# Altium PCB PCB_BOB.PcbDoc (part 1 of 2)
Units mil, origin at the board's own origin, x right, y up, seen from the top; angles counter-clockwise.
Board outline 2103 x 1454 mil, 2 copper layers (Top Layer, Bottom Layer), stack 62 mil thick; 57 components, 42 nets, 189 pads, 71 vias.
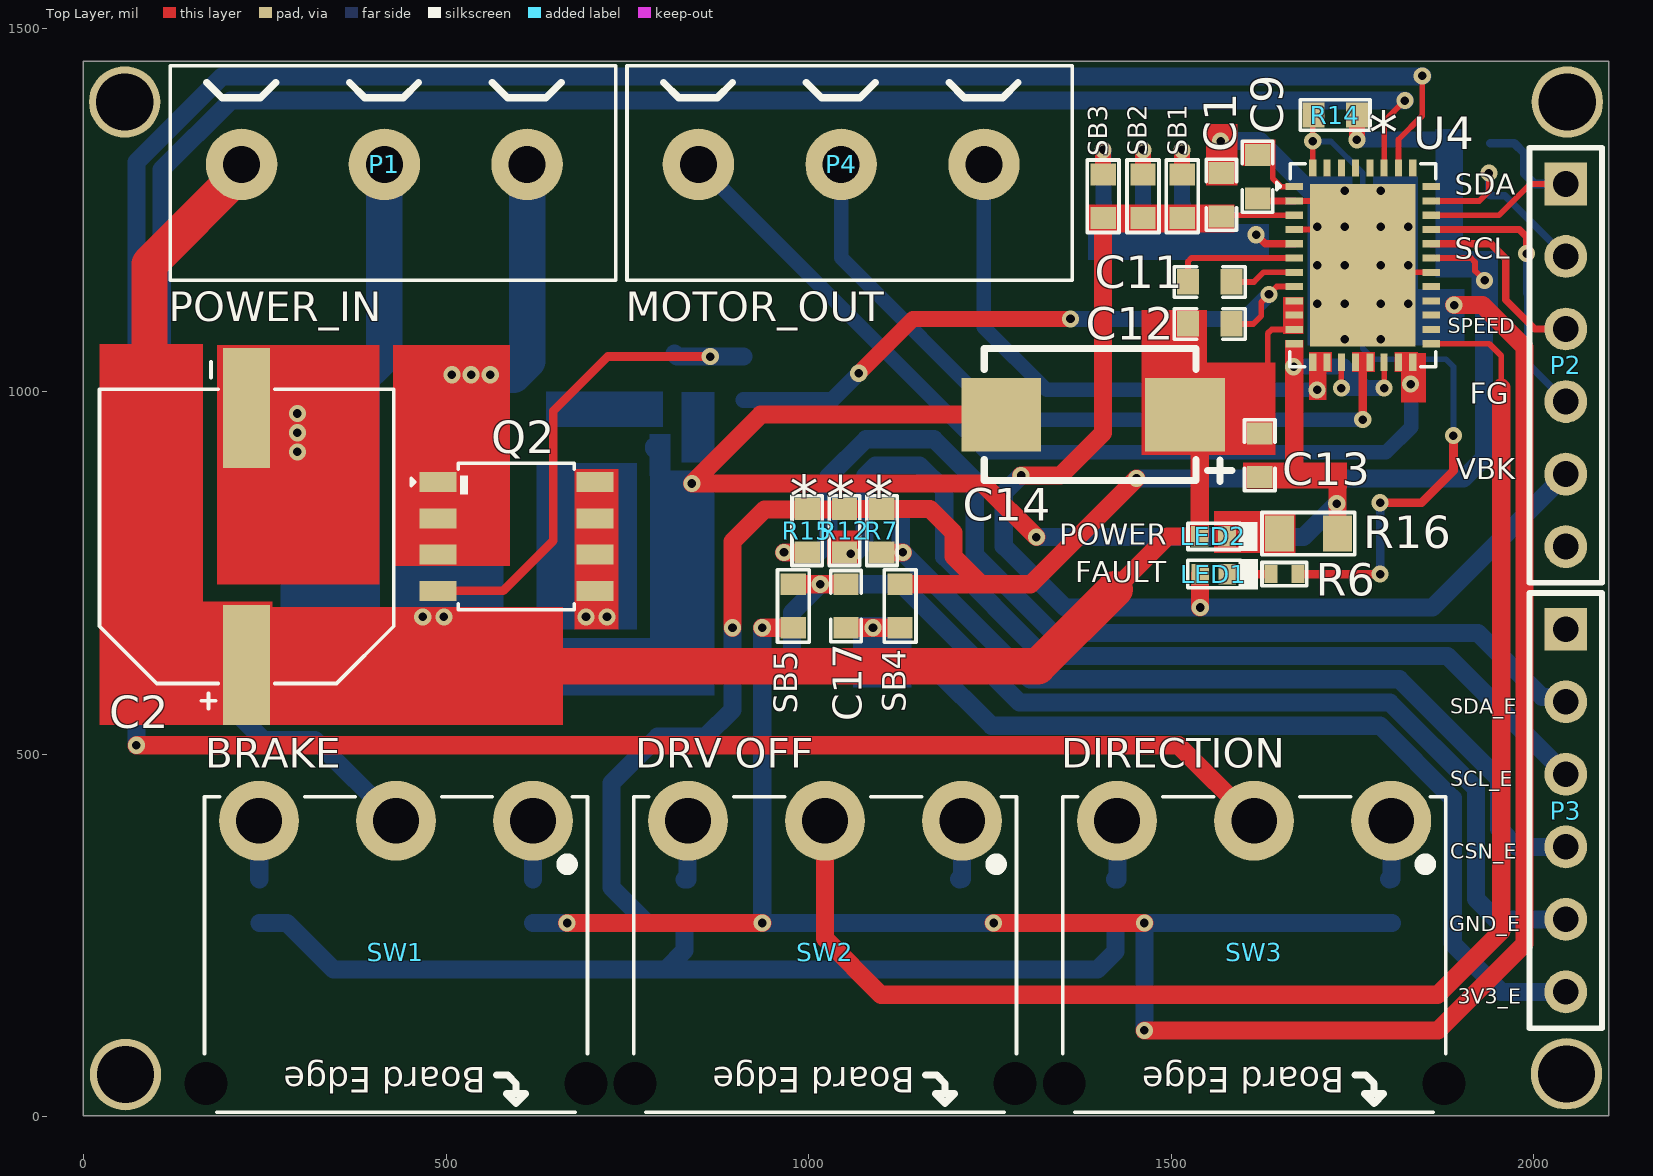
[diagram p0: Top Layer view]
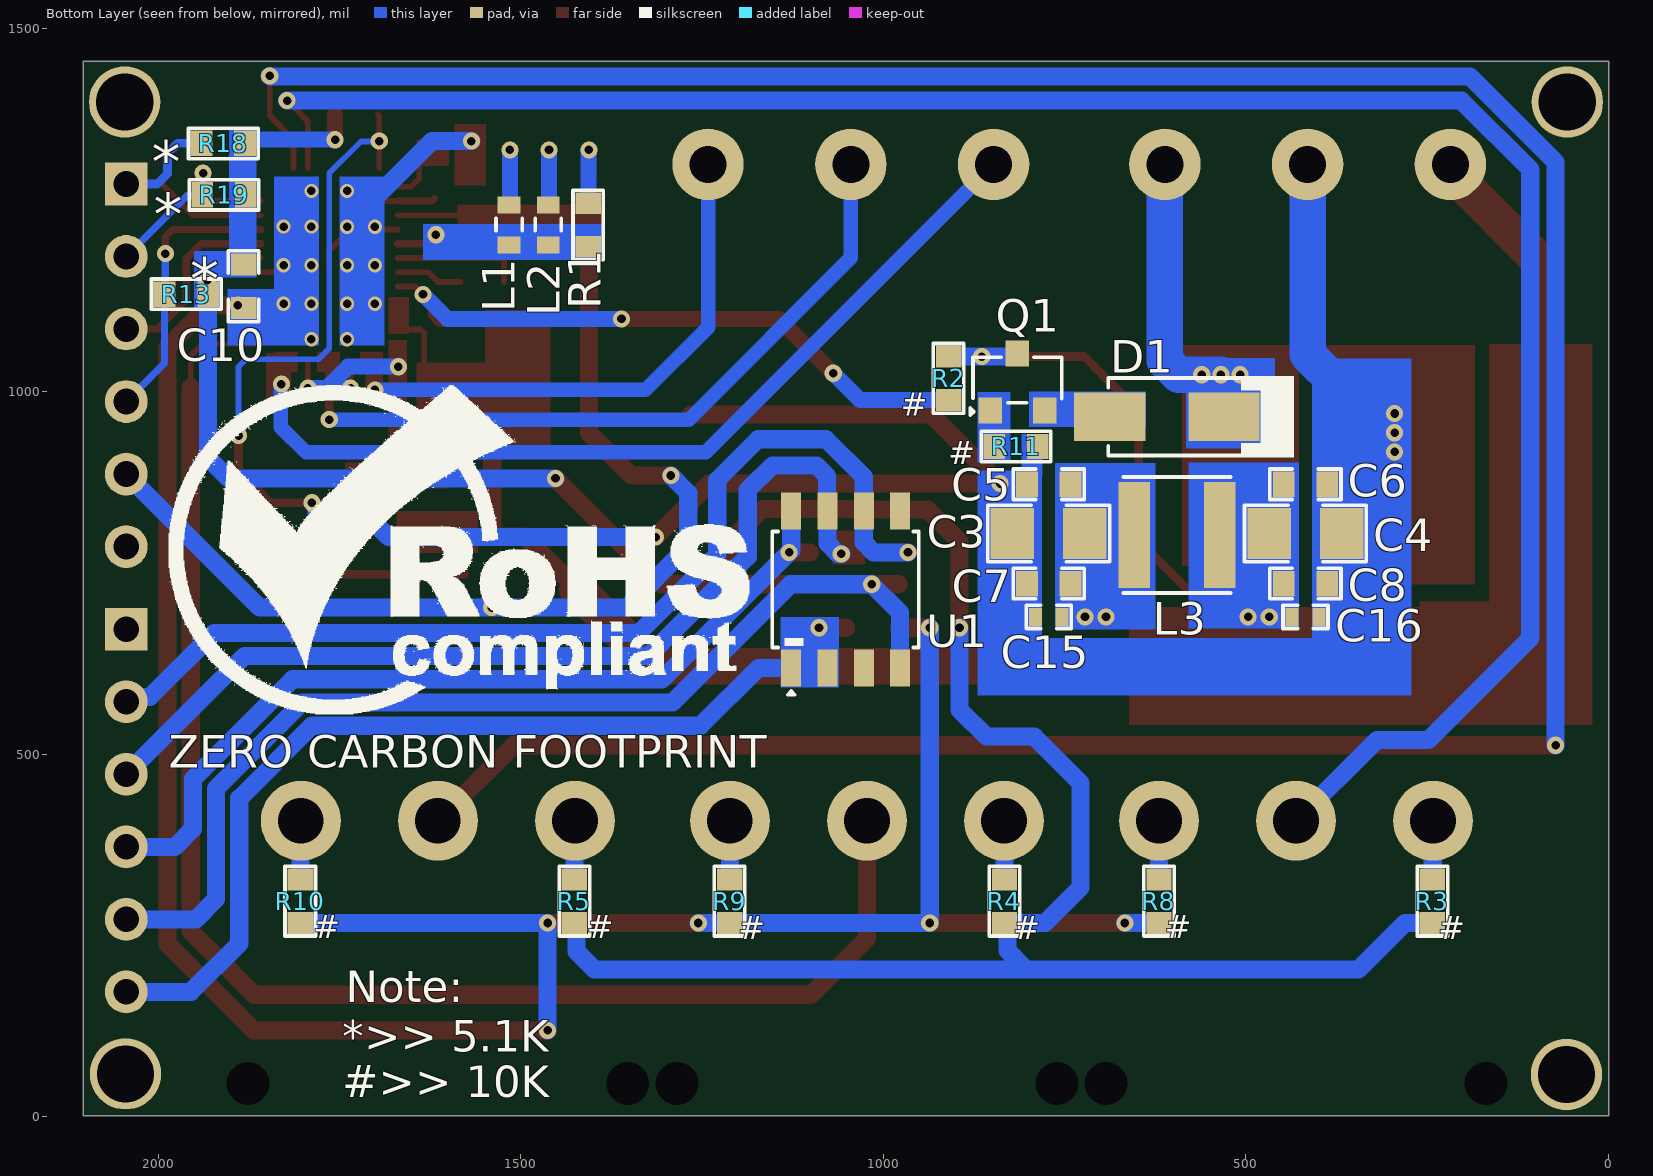
[diagram p1: Bottom Layer view, seen from below]
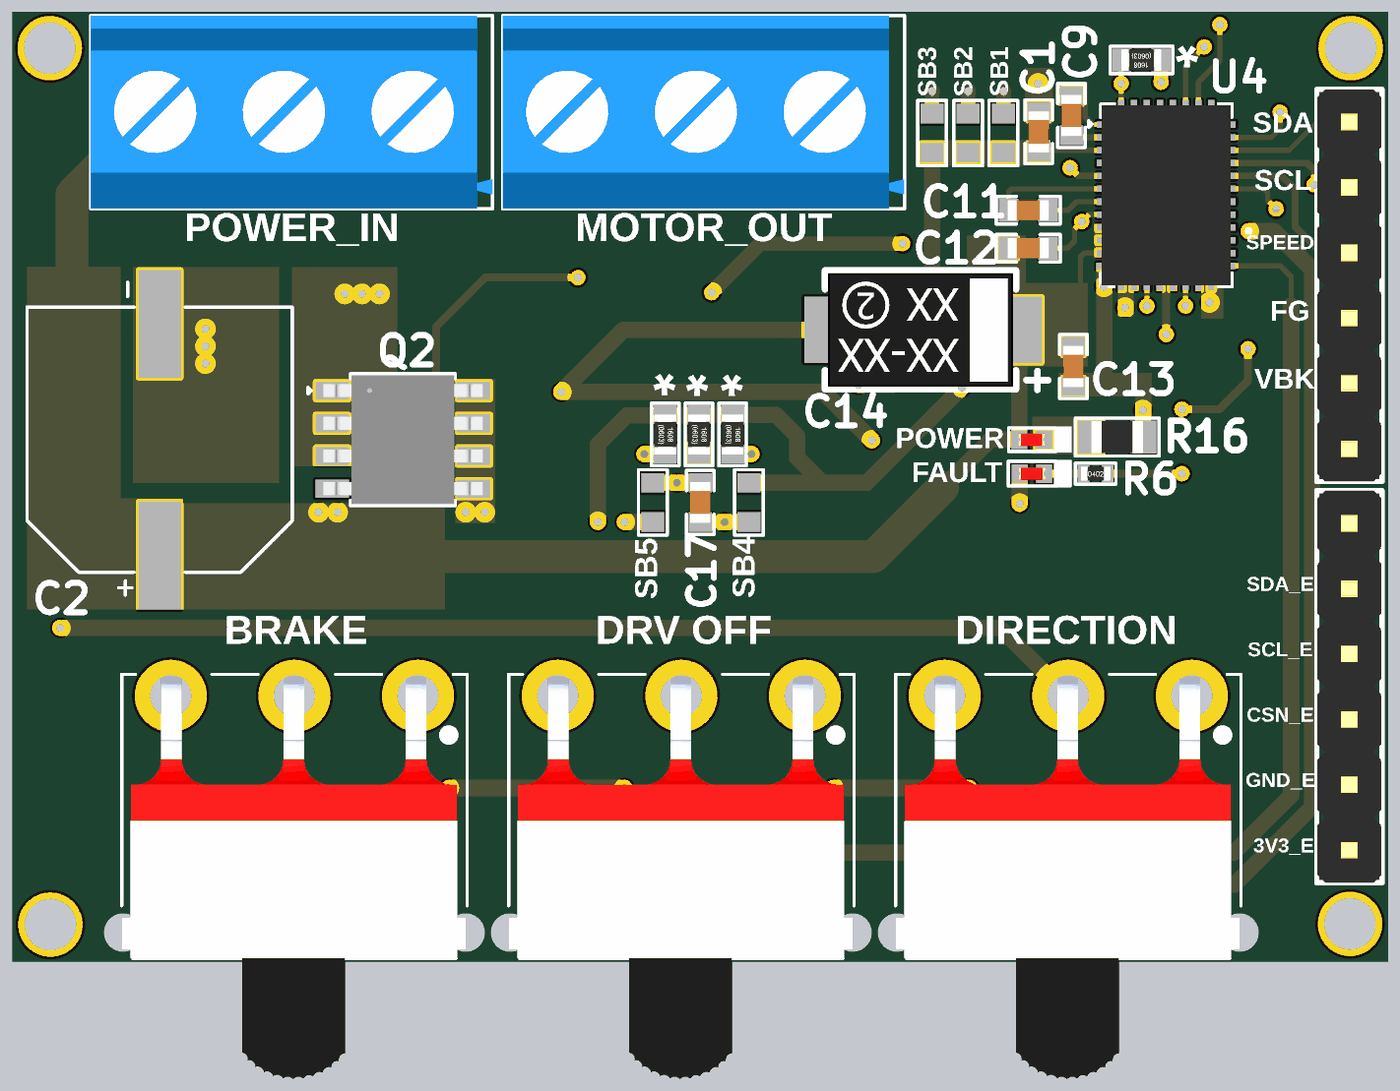
[diagram p2: 3D render of the assembled board from above, using the file's embedded part models]
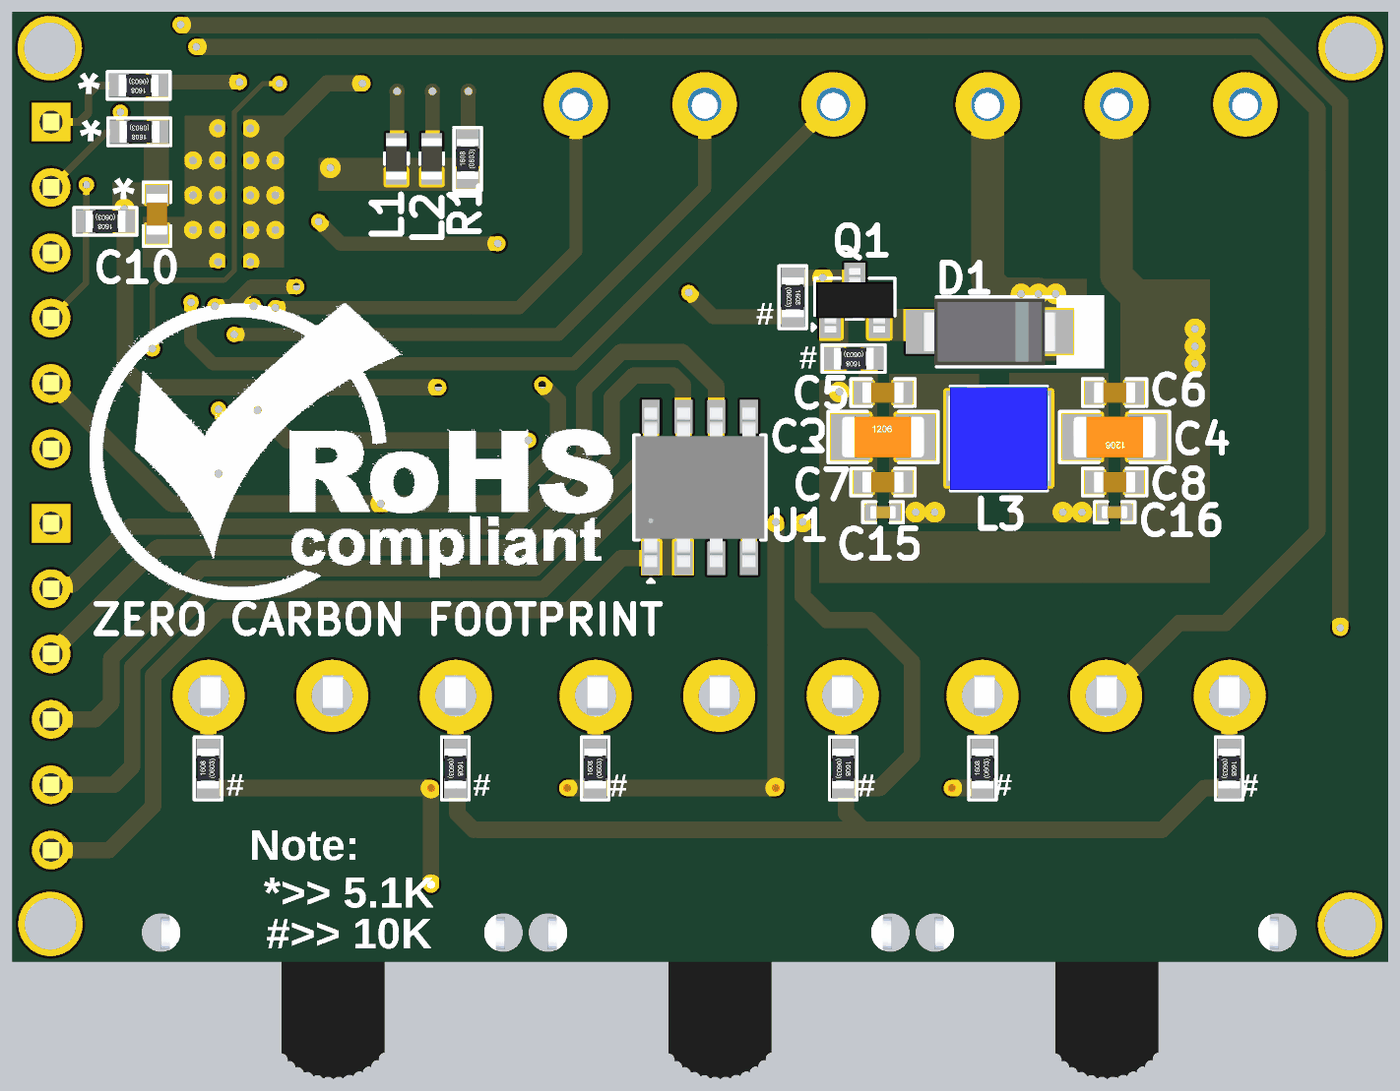
[diagram p3: 3D render of the assembled board from below, using the file's embedded part models]

## Layer stack, top to bottom
Top Solder: solder mask 0.5, Solder Resist, Dk 3.5
Top Layer: signal copper 12.5
Dielectric 1: dielectric 37, FR-4, Dk 4.8
Bottom Layer: signal copper 12.5
Bottom Solder: solder mask 0.5, Solder Resist, Dk 3.5

## Board outline
0,1 0,1455 2103,1455 2103,1

## Design rules (kind name [scope] priority, off if disabled: settings)
Clearance [All] p1: gap=7 ignorepadtopadclearanceinfootprint=FALSE except(4: Arc-SMDPad Track-SMDPad SMDPad-SMDPad)
ComponentClearance [All] p1: gap=0 collisioncheckmode=3 verticalgap=0 showdistances=FALSE
HoleSize [All] p1: absolutevalues=TRUE maxlimit=1000 minlimit=1 maxpercent=80.000 minpercent=20.000
HoleToHoleClearance [All] p1: gap=0 allowstackedmicrovias=TRUE
MinimumSolderMaskSliver [All] p1: minsoldermaskwidth=0
PolygonConnect [All] p1: connectstyle=Relief reliefconductorwidth=10 reliefentries=4 polygonreliefangle="90 Angle" airgapwidth=10
RoutingVias [All] p1: holewidth=11.81 width=23.62 viastyle="Through Hole" minholewidth=11.81 minwidth=19.68 maxholewidth=31.5 maxwidth=62.99
SilkToSilkClearance [All] p1: silktosilkclearance=0
SilkToSolderMaskClearance [IsPad] p1: minsilkscreentomaskgap=0 clearancetoexposedcopper=TRUE
SolderMaskExpansion [All] p1: expansion=4 istentingtop=FALSE
Width [All] p1: maxlimit=100 minlimit=8 preferedwidth=12 minimp=50.000000 maximp=50.000000 favimp=50.000000
24 further rules are at their usual default settings.

## Classes and differential pairs
component class U_Header_Connector: P1 P2 P3 P4
component class "U_Power Supply": C2 C3 C4 C5 C6 C7 C8 C15 C16 D1 L3 Q1 Q2 R2 R11
component class U_Encoder: C17 R7 R12 R15 SB4 SB5 U1
component class U_DRIVER: C1 C9 C10 C11 C12 C13 C14 L1 L2 R1 R13 R14 R18 R19 SB1 SB2 SB3 U4
component class U_Control_Indicator: LED1 LED2 R3 R4 R5 R6 R8 R9 R10 R16 SW1 SW2 SW3

## Components (designator, comment, footprint, x,y, rotation, side; value= is the part's Value field where it differs from the comment)
C1 "22uF" Cap-0603 1569,1271 r270 top
C2 "330uF" VZT-330uF-10mmDia 225,800 r90 top locked
C3 "1uF" Cap-1206 772,804 r180 bottom locked
C4 "1uF" Cap-1206 418,804 r0 bottom locked
C5 "0.1uF" Cap-0603 772,872 r180 bottom locked
C6 "0.1uF" Cap-0603 418,872 r0 bottom locked
C7 "10nF" Cap-0603 772,735 r0 bottom locked
C8 "10nF" Cap-0603 418,735 r180 bottom locked
C9 "1uF" Cap-0603 1619,1296 r90 top
C10 "1uF" Cap-0603 1882,1145 r90 bottom
C11 "47nF" Cap-0603 1553,1151 r0 top
C12 "1uF" Cap-0603 1553,1093 r0 top
C13 "0.1uF" Cap-0603 1622,912 r270 top
C14 "100uF" Case-E 1519,968 r180 top
C15 "1000pF" Cap-0402 772,689 r180 bottom locked
C16 "1000pF" Cap-0402 418,689 r0 bottom locked
C17 "0.1uF" Cap-0603 1051.5,704 r90 top locked
D1 "S1A-13-F" SMA 609,965 r0 bottom locked
L1 "47uH" "IND-0603 (1608 Metric)" 1516,1229.56 r90 bottom
L2 "22uH" "IND-0603 (1608 Metric)" 1462,1229.56 r90 bottom
L3 "1uH" WPN4020H1R0MT_ 595,802 r180 bottom locked
LED1 "Red" "LED 0402" 1558.5,748 r0 top locked
LED2 "Green" LED-0402 1558,800 r0 top locked
P1 "WJ301V-5.0-3P" WJ301V-5.0-3P#1 611.85,1313 r180 top value=Custom
P2 "61300611121" HDR1X6_ 2044,1286 r270 top
P3 "61300611121" HDR1X6_ 2044,672 r270 top
P4 "WJ301V-5.0-3P" WJ301V-5.0-3P#2 1044.85,1313 r180 top
Q1 "LH8050QLT1G" SOT-23-3L_ 815.13,1013 r180 bottom locked
Q2 "NCE6008AS" SOP-8 597,800 r0 top locked
R1 "22R" Res-0603 1407,1229.56 r270 bottom
R2 "10K" Res-0603 910,1018 r90 bottom locked
R3 "10K" Res-0603 243,297 r90 bottom locked
R4 "10K" Res-0603 833,297 r90 bottom locked
R5 "10K" Res-0603 1426,297 r90 bottom locked
R6 "1K" Res0402 1656,748 r0 top
R7 "5.1K" Res-0603 1101,808 r90 top
R8 "10K" Res-0603 620,297 r270 bottom locked
R9 "10K" Res-0603 1212,297 r270 bottom locked
R10 "10K" Res-0603 1804,297 r270 bottom locked
R11 "10K" Res-0603 817,924 r180 bottom locked
R12 "5.1K" Res-0603 1049.5,808 r90 top
R13 "5.1K" Res-0603 1961,1134 r180 bottom
R14 "5.1K" Res-0603 1726,1381 r0 top
R15 "5.1K" Res-0603 998,808 r90 top
R16 "4.7k" RES-0805 1689,804 r0 top
R18 "5.1K" Res-0603 1910,1342 r180 bottom
R19 "5.1K" Res-0603 1909,1271 r180 bottom
SB1 "Solder Bridge" "Solder Bridge" 1515,1269 r270 top
SB2 "Solder Bridge" "Solder Bridge" 1461,1269 r270 top
SB3 "Solder Bridge" "Solder Bridge" 1406,1269 r270 top
SB4 "Solder Bridge" "Solder Bridge" 1126,704 r270 top locked
SB5 "Solder Bridge" "Solder Bridge" 979,704 r90 top locked
SW1 "SS-12D11G5R" SS-12D11G5R_ 619.98,408 r180 top locked
SW2 "SS-12D11G5R" SS-12D11G5R_ 1211.57,408 r180 top locked
SW3 "SS-12D11G5R" SS-12D11G5R_ 1803.17,408 r180 top locked
U1 "MT6701CT-STD-R" SOP-8 1052,727 r90 bottom locked
U4 "MCF8316A1VRGFR" "40-VQFN (7X5)" 1764,1174 r0 top

## Footprints (in the part's own frame and the unit in brackets; to place one, negate y for a bottom-side part, rotate by r counter-clockwise, add the part's x,y. Pads: shape width x height; smd on the part's side, far side on the other; paste and mask are expansions set on the pad)
"40-VQFN (7X5)" [mm]
  rect 0.6x0.25 smd: 1(-2.4,2.75) 2(-2.4,2.25) 3(-2.4,1.75) 4(-2.4,1.25) 5(-2.4,0.75) 6(-2.4,0.25) 7(-2.4,-0.25) 8(-2.4,-0.75) 9(-2.4,-1.25) 10(-2.4,-1.75) 11(-2.4,-2.25) 12(-2.4,-2.75) 21(2.4,-2.75) 22(2.4,-2.25) 23(2.4,-1.75) 24(2.4,-1.25) 25(2.4,-0.75) 26(2.4,-0.25) 27(2.4,0.25) 28(2.4,0.75) 29(2.4,1.25) 30(2.4,1.75) 31(2.4,2.25) 32(2.4,2.75)
  rect 0.25x0.6 smd: 13(-1.75,-3.4) 14(-1.25,-3.4) 15(-0.75,-3.4) 16(-0.25,-3.4) 17(0.25,-3.4) 18(0.75,-3.4) 19(1.25,-3.4) 20(1.75,-3.4) 33(1.75,3.4) 34(1.25,3.4) 35(0.75,3.4) 36(0.25,3.4) 37(-0.25,3.4) 38(-0.75,3.4) 39(-1.25,3.4) 40(-1.75,3.4)
  rect 3.7x5.7 smd: 41(0,0.001)
  silkscreen extent -3.01,-3.56 2.56,3.56, body extent -2.5,-3.5 2.5,3.5, height 1
Cap-0402 [mil]
  rect 18x25 smd mask+2.36: 1(-18.5,0) 2(18.5,0)
  silkscreen extent -31,-16 31,16, body extent -20,-10 20,10, height 19
Cap-0603 [mil]
  rect 30x35 smd mask+2.36: 1(-30,0) 2(30,0)
  silkscreen extent -49,-21 49,21, body extent -32,-16 31,16, height 34
Cap-1206 [mil] "SMD 1206"
  rect 60x70 smd: 1(-50,0) 2(50,0)
  silkscreen extent -84,-39 84,39, body extent -63,-31 63,32, height 39
Case-E [mm]
  rect 2.79x2.57 smd: 1(0,0) 2(6.44,0)
  silkscreen extent -1.63,-2.31 7.03,2.34, body extent -0.27,-2.21 6.92,2.21, height 2.88
HDR1X6_ [mm] "Connector; Header; 6 Position"
  rect 1.5x1.5 hole 0.9: 1(0,0)
  round 1.5 hole 0.9: 2(2.54,0) 3(5.08,0) 4(7.62,0) 5(10.16,0) 6(12.7,0)
  silkscreen extent -1.27,-1.27 13.97,1.27, body extent -1.27,-1.24 13.97,1.25, height 8.54
"IND-0603 (1608 Metric)" [mm] "0.063\" L x 0.032\" W (1.60mm x 0.80mm)"
  rect 0.6x0.8 smd: 1(-0.7,0) 2(0.7,0)
  silkscreen extent -0.2,-0.46 0.23,0.46, body extent -0.8,-0.4 0.8,0.4, height 0.78
"LED 0402" [mm]
  rect 0.62x0.72 smd: 1(-0.475,0) 2(0.475,0)
  silkscreen extent -0.91,-0.53 1.55,0.53, body extent -0.5,-0.25 0.51,0.25, height 0.45
LED-0402 [mm]
  rect 0.62x0.72 smd: 1(-0.475,0) 2(0.475,0)
  silkscreen extent -0.89,-0.51 1.55,0.51, body extent -0.5,-0.25 0.51,0.25, height 0.45
Res0402 [mil]
  rect 18x25 smd mask+4: 1(-18.5,0) 2(18.5,0)
  silkscreen extent -32,-17 32,16, body extent -23,-11 23,11, height 16
Res-0603 [mil]
  rect 30x35 smd: 1(-30,0) 2(30,0)
  silkscreen extent -48,-21 48,21, body extent -31,-17 31,17, height 18
RES-0805 [mil] "SMD 0805"
  rect 40x50 smd: 1(-40,0) 2(40,0)
  silkscreen extent -64,-29 64,29, body extent -39,-25 39,24, height 24
SMA [mm]
  rect 2.5x1.7 smd: 1(-2,0) 2(2,0)
  silkscreen extent -4.44,-1.42 2.06,1.42, body extent -2.6,-1.3 2.6,1.3, height 2.4
"Solder Bridge" [mil] "Solder Bridge ON"
  rect 30x35 smd: 1(-30,0) 2(30,0)
  silkscreen extent -50,-22 50,22
SOP-8 [mm]
  rect 1.3x0.7 smd: 1(-2.75,1.905) 2(-2.75,0.635) 3(-2.75,-0.635) 4(-2.75,-1.905) 5(2.75,-1.905) 6(2.75,-0.635) 7(2.75,0.635) 8(2.75,1.905)
  silkscreen extent -3.69,-2.57 2.03,2.57, body extent -3.1,-2.5 3.1,2.5, height 1.76
SOT-23-3L_ [mm]
  rect 0.82x0.92 smd: 1(-0.95,-1) 2(0.95,-1) 3(0,1)
  silkscreen extent -1.65,-1.17 1.56,0.86, body extent -1.5,-1.25 1.5,1.25, height 1.1
SS-12D11G5R_ [mm]
  round 2.8 hole 1.6: 1(0,0) 2(4.8,0) 3(9.6,0)
  round 0 hole 1.5 unplated: MH1(-1.85,9.2) MH2(11.45,9.2)
  silkscreen extent -1.91,-0.84 11.51,10.21, body extent -1.85,-0.79 11.5,14.9, height 6.85
VZT-330uF-10mmDia [mm]
  rect 4.2x1.65 smd: 1(-4.5,0) 2(4.5,0)
  silkscreen extent -6.04,-5.15 6.12,5.15
WJ301V-5.0-3P#1 [mm]
  round 2.5 hole 1.3: 1(0,0) 2(5,0) 3(10,0)
  silkscreen extent -3.1,-3.45 12.5,4.06, body extent -3.1,-3.44 12.5,4.05, height 10
WJ301V-5.0-3P#2 [mm]
  round 2.5 hole 1.3: 1(-5,0) 2(0,0) 3(5,0)
  silkscreen extent -8.1,-3.45 7.5,4.06, body extent -8.1,-3.44 7.5,4.05, height 10
WPN4020H1R0MT_ [mm]
  rect 1.1x3.7 smd: 1(-1.5,0) 2(1.5,0)
  silkscreen extent -1.88,-2.03 1.88,2.03, body extent -2,-2 2,2, height 2

## Part data
C1: library part CC0603MRX5R6BB226, "CAP CER 22UF 10V X5R 0603", Case Code (Imperial)=0603, Case Code (Metric)=1608, Dielectric=X5R, LCSC Part Number=C109447, Manufacturer=Yageo, Max Operating Temperature=85°C, Min Operating Temperature=-55°C, Package Quantity=4000, Supplier Part Number 1=311-1819-1-ND, Tolerance=20%, Voltage Rating=10V, Capacitance=22uF, Case/Package=0603, Category="Ceramic Capacitors", ComponentLink1Description=http://www.mouser.com/ds/2/447/Yageo_UPY-GP_NP0_16V-to-50V_9-358835.pdf?src-supplier=Mouser, ComponentLink1URL=http://www.mouser.com/ds/2/447/Yageo_UPY-GP_NP0_16V-to-50V_9-358835.pdf?src-supplier=Mouser, ComponentLink2Description=http://www.yageo.com/documents/recent/UPY-GPHC_X5R_4V-to-50V_25.pdf?src-supplier=Digi-Key, ComponentLink2URL=http://www.yageo.com/documents/recent/UPY-GPHC_X5R_4V-to-50V_25.pdf?src-supplier=Digi-Key, Halogen Free="Halogen Free", Height=0.8mm, Lead Free="Lead Free", Length=0.063inch, Manufacturer Part Number=CC0603MRX5R6BB226, Mount="Surface Mount", Packaging="Tape and Reel", Pricing 1="1=0.68000, 10=0.48000, 50=0.36300, 100=0.31610, 500=0.23416, 1000=0.19903 (USD)", RoHS=Yes, RoHS Compliant=Yes, Stock 1=19628, Supplier 1=Digi-Key, Termination=SMD/SMT, Thickness=0.035inch, Voltage Rating (DC)=10V, Weight=7.1E-05oz, Width=0.8mm
C2: library part VZT331M1HTR-1010, "VZT Series 50 V 330 uF 105°C 10 x 10 mm SMT Aluminum Electrolytic Capacitor", Manufacturer="Surge Components", Manufacturer Part Number=VZT331M1HTR-1010S, Supplier Part Number 1=8161943, Lead Free="Lead Free", Pricing 1="500=0.28000, 1500=0.27000, 2000=0.26500, 5000=0.26000, 7500=0.25000 (USD)", RoHS=Yes, Stock 1=35000, Supplier 1="Future Electronics"
C3 C4: library part GRM31CR72A105KA01K, "CAP CER 1UF 100V X7R 1206", Case Code (Imperial)=1206, Case Code (Metric)=3216, Dielectric=X7R, LCSC Part Number=C909823, Manufacturer=Murata, Max Operating Temperature=125°C, Min Operating Temperature=-55°C, Package Quantity=1, Supplier Part Number 1=490-6523-1-ND, Tolerance=10%, Voltage Rating=100V, Capacitance=1uF, Case/Package=1206, Category="Ceramic Capacitors", ComponentLink1Description=https://datasheet.ciiva.com/11616/product-11616604.pdf?src-supplier=Avnet, ComponentLink1URL=https://datasheet.ciiva.com/11616/product-11616604.pdf?src-supplier=Avnet, ComponentLink2Description=https://datasheet.ciiva.com/6264/partnumbering-e-01-6264397.pdf?src-supplier=Digi-Key, ComponentLink2URL=https://datasheet.ciiva.com/6264/partnumbering-e-01-6264397.pdf?src-supplier=Digi-Key, ComponentLink3Description=https://datasheet.ciiva.com/6264/partnumbering-e-01-6264398.pdf?src-supplier=Digi-Key, ComponentLink3URL=https://datasheet.ciiva.com/6264/partnumbering-e-01-6264398.pdf?src-supplier=Digi-Key, ComponentLink4Description=https://datasheet.ciiva.com/6264/partnumbering-e-01-6264399.pdf?src-supplier=Digi-Key, ComponentLink4URL=https://datasheet.ciiva.com/6264/partnumbering-e-01-6264399.pdf?src-supplier=Digi-Key, Construction=Flat, Depth=1.6mm, Height=1.6mm, Length=3.2mm, Manufacturer Part Number=GRM31CR72A105KA01K, Mount="Surface Mount", Packaging="Tape and Reel", Pricing 1="1=0.48000, 10=0.33000, 50=0.23100, 100=0.19800, 500=0.14850, 1000=0.12540, 2500=0.11880 (USD)", Radiation Hardening=No, RoHS=Yes, RoHS Compliant=Yes, Series=GRM, Stock 1=11842, Supplier 1=Digi-Key, Termination=SMD/SMT, Thickness=0.071inch, Voltage Rating (DC)=100V, Width=1.6mm
C5 C6 C13 C17: library part CC0603KRX7R0BB104, "CAP CER 0.1UF 100V X7R 0603", Capacitance=100nF, Case Code (Imperial)=0603, Case Code (Metric)=1608, Dielectric=X7R, LCSC Part Number=C113803, Manufacturer=Yageo, Max Operating Temperature=125°C, Min Operating Temperature=-55°C, Package Quantity=4000, Resistor Type=Ceramic, Supplier Part Number 1=311-1523-1-ND, Tolerance=10%, Voltage Rating=100V, Case/Package=0603, Category="Ceramic Capacitors", ComponentLink1Description=https://datasheet.ciiva.com/6277/mlccorderingcode-6277030.pdf?src-supplier=Digi-Key, ComponentLink1URL=https://datasheet.ciiva.com/6277/mlccorderingcode-6277030.pdf?src-supplier=Digi-Key, ComponentLink2Description=https://datasheet.ciiva.com/6277/mlccorderingcode-6277081.pdf?src-supplier=Digi-Key, ComponentLink2URL=https://datasheet.ciiva.com/6277/mlccorderingcode-6277081.pdf?src-supplier=Digi-Key, ComponentLink3Description=https://datasheet.ciiva.com/6277/mlccorderingcode-6277082.pdf?src-supplier=Digi-Key, ComponentLink3URL=https://datasheet.ciiva.com/6277/mlccorderingcode-6277082.pdf?src-supplier=Digi-Key, Depth=0.8mm, Lead Free="Lead Free", Length=0.063inch, Manufacturer Part Number=CC0603KRX7R0BB104, Mount="Surface Mount", Packaging="Tape and Reel", Pricing 1="1=0.19000, 10=0.13500, 50=0.07680, 100=0.06370, 500=0.04466, 1000=0.03696 (USD)", RoHS=Yes, RoHS Compliant=Yes, Series=CC, Stock 1=60476, Supplier 1=Digi-Key, Termination=SMD/SMT, Thickness=0.035inch, Voltage Rating (DC)=100V, Weight=7.1E-05oz, Width=0.031inch
C7 C8: library part AC0603KRX7R0BB103, "100V 10nF X7R ±10% 0603 Multilayer Ceramic Capacitors MLCC - SMD/SMT ROHS"
C9 C10: library part CC0603KRX5R8BB105, "CAP CER 1UF 25V X5R 0603", Case Code (Imperial)=0603, Case Code (Metric)=1608, Dielectric=X5R, LCSC Part Number=C14664, Manufacturer=Yageo, Max Operating Temperature=85°C, Min Operating Temperature=-55°C, Package Quantity=1, Supplier Part Number 1=311-1445-1-ND, Tolerance=10%, Voltage Rating=25V, Capacitance=1uF, Case/Package=0603, Category="Ceramic Capacitors", ComponentLink1Description=https://datasheet.ciiva.com/176/mlccorderingcode-176785.pdf?src-supplier=Digi-Key, ComponentLink1URL=https://datasheet.ciiva.com/176/mlccorderingcode-176785.pdf?src-supplier=Digi-Key, ComponentLink2Description=https://datasheet.ciiva.com/176/mlccorderingcode-176786.pdf?src-supplier=Digi-Key, ComponentLink2URL=https://datasheet.ciiva.com/176/mlccorderingcode-176786.pdf?src-supplier=Digi-Key, ComponentLink3Description=https://datasheet.ciiva.com/176/mlccorderingcode-176787.pdf?src-supplier=Digi-Key, ComponentLink3URL=https://datasheet.ciiva.com/176/mlccorderingcode-176787.pdf?src-supplier=Digi-Key, ComponentLink4Description=https://datasheet.ciiva.com/17436/upy-gphc-x5r-4v-to-50v-12-17436952.pdf?src-supplier=Avnet+Europe, ComponentLink4URL=https://datasheet.ciiva.com/17436/upy-gphc-x5r-4v-to-50v-12-17436952.pdf?src-supplier=Avnet+Europe, ComponentLink5Description=https://datasheet.ciiva.com/7978/1525783-7978171.pdf?src-supplier=Element14, ComponentLink5URL=https://datasheet.ciiva.com/7978/1525783-7978171.pdf?src-supplier=Element14, ComponentLink6Description=https://datasheet.ciiva.com/11586/upy-gphc-x5r-4v-to-50v-12-11586318.pdf?src-supplier=Avnet, ComponentLink6URL=https://datasheet.ciiva.com/11586/upy-gphc-x5r-4v-to-50v-12-11586318.pdf?src-supplier=Avnet, Construction=Flat, Depth=0.8mm, Halogen Free="Halogen Free", Height=0.8mm, Lead Free="Lead Free", Length=1.6mm, Manufacturer Part Number=CC0603KRX5R8BB105, Mount="Surface Mount", Number of Pins=2, Packaging="Tape and Reel", Pricing 1="1=0.12000, 10=0.08400, 50=0.04760, 100=0.03940, 500=0.02764, 1000=0.02288 (USD)", Radiation Hardening=No, REACH SVHC="No SVHC", RoHS=Yes, RoHS Compliant=Yes, Series=CC, Stock 1=919939, Supplier 1=Digi-Key, Termination=SMD/SMT, Thickness=0.035inch, Voltage Rating (DC)=25V, Width=0.031inch
C11: library part CGA3E2X8R1H473M080AA, "CAP CER 0.047UF 50V X8R 0603", Case Code (Imperial)=0603, Case Code (Metric)=1608, Dielectric=X8R, LCSC Part Number=C2172709, Manufacturer=TDK, Max Operating Temperature=150°C, Min Operating Temperature=-55°C, Package Quantity=4000, Ratings=AEC-Q200, Supplier Part Number 1=445-12603-1-ND, Tolerance=20%, Voltage Rating=50V, Capacitance=47nF, Case/Package=0603, Category="Ceramic Capacitors", ComponentLink1Description=http://www.mouser.com/ds/2/400/mlcc_automotive_hightemp_en-520039.pdf?src-supplier=Mouser, ComponentLink1URL=http://www.mouser.com/ds/2/400/mlcc_automotive_hightemp_en-520039.pdf?src-supplier=Mouser, ComponentLink2Description=https://product.tdk.com/info/en/catalog/spec/mlccspec_automotive_hightemp_en.pdf?src-supplier=Digi-Key, ComponentLink2URL=https://product.tdk.com/info/en/catalog/spec/mlccspec_automotive_hightemp_en.pdf?src-supplier=Digi-Key, ComponentLink3Description=http://product.tdk.com/en/catalog/datasheets/mlcc_automotive_hightemp_en.pdf?src-supplier=Avnet, ComponentLink3URL=http://product.tdk.com/en/catalog/datasheets/mlcc_automotive_hightemp_en.pdf?src-supplier=Avnet, Features="High Temperature", Height=0.8mm, Length=0.063inch, Manufacturer Part Number=CGA3E2X8R1H473M080AA, Mount="Surface Mount", Packaging="Tape and Reel", Pricing 1="1=0.16000, 10=0.11200, 50=0.06360, 100=0.05260, 500=0.03690, 1000=0.03055 (USD)", RoHS=Yes, Stock 1=1279, Supplier 1=Digi-Key, Thickness=0.035inch, Voltage Rating (DC)=50V, Weight=7.1E-05oz, Width=0.031inch
C12: library part UMK107AB7105KA-T, "CAP CER 1UF 50V X7R 0603", Case Code (Imperial)=0603, Case Code (Metric)=1608, Dielectric=X7R, LCSC Part Number=C105174, Manufacturer="Taiyo Yuden", Max Operating Temperature=125°C, Min Operating Temperature=-55°C, Package Quantity=1, Supplier Part Number 1=587-3247-1-ND, Tolerance=10%, Voltage Rating=50V, Capacitance=1uF, Case/Package=0603, ComponentLink1Description=http://www.farnell.com/datasheets/2048165.pdf?src-supplier=Element14, ComponentLink1URL=http://www.farnell.com/datasheets/2048165.pdf?src-supplier=Element14, ComponentLink2Description=https://www.murata.com/~/media/webrenewal/support/library/catalog/products/capacitor/mlcc/c02e.ashx?la=en-us&src-supplier=Digi-Key, ComponentLink2URL=https://www.murata.com/~/media/webrenewal/support/library/catalog/products/capacitor/mlcc/c02e.ashx?la=en-us&src-supplier=Digi-Key, ComponentLink3Description=https://www.yuden.co.jp/productdata/catalog/mlcc_all_e.pdf?src-supplier=Digi-Key, ComponentLink3URL=https://www.yuden.co.jp/productdata/catalog/mlcc_all_e.pdf?src-supplier=Digi-Key, ComponentLink4Description=https://www.yuden.co.jp/productdata/catalog/mlcc_all_e.pdf?src-supplier=Onlinecomponents.com, ComponentLink4URL=https://www.yuden.co.jp/productdata/catalog/mlcc_all_e.pdf?src-supplier=Onlinecomponents.com, Depth=0.8mm, Halogen Free="Halogen Free", Height=0.8mm, Length=1.6mm, Manufacturer Part Number=UMK107AB7105KA-T, Mount="Surface Mount", Packaging="Tape and Reel", Pricing 1="1=0.28, 10=0.19, 100=0.1079, 500=0.0762, 1000=0.0667 (USD)", Radiation Hardening=No, Stock 1=453098, Supplier 1=Digi-Key, Termination=SMD/SMT, Thickness=0.037inch, Voltage Rating (DC)=50V, Width=0.031inch
C14: library part TAJE107M025RNJ, "CAP TANT 100UF 20% 25V 2917", Case Code (Imperial)=2917, Case Code (Metric)=7343, ESR (Equivalent Series Resistance)=300mR, LCSC Part Number=C7230, Leakage Current=25uA, Manufacturer="Kyocera AVX", Max Operating Temperature=125°C, Min Operating Temperature=-55°C, Package Quantity=1, Supplier Part Number 1=581-TAJE107M025RNJ, Tolerance=20%, Voltage Rating=25V, Capacitance=100uF, Case/Package=2917, Category="Tantalum Capacitors", ComponentLink1Description=https://datasheet.ciiva.com/26787/taje107m025rnj-26787048.pdf?src-supplier=IIIC, ComponentLink1URL=https://datasheet.ciiva.com/26787/taje107m025rnj-26787048.pdf?src-supplier=IIIC, ComponentLink2Description=https://datasheet.ciiva.com/265/taj-265541.pdf?src-supplier=Digi-Key, ComponentLink2URL=https://datasheet.ciiva.com/265/taj-265541.pdf?src-supplier=Digi-Key, ComponentLink3Description=https://datasheet.ciiva.com/265/taj-265542.pdf?src-supplier=Digi-Key, ComponentLink3URL=https://datasheet.ciiva.com/265/taj-265542.pdf?src-supplier=Digi-Key, ComponentLink4Description=https://datasheet.ciiva.com/265/taj-265540.pdf?src-supplier=Digi-Key, ComponentLink4URL=https://datasheet.ciiva.com/265/taj-265540.pdf?src-supplier=Digi-Key, ComponentLink5Description=https://datasheet.ciiva.com/28609/1719052-28609254.pdf?src-supplier=Element14, ComponentLink5URL=https://datasheet.ciiva.com/28609/1719052-28609254.pdf?src-supplier=Element14, ComponentLink6Description=https://datasheet.ciiva.com/11230/taj-11230456.pdf?src-supplier=Avnet, ComponentLink6URL=https://datasheet.ciiva.com/11230/taj-11230456.pdf?src-supplier=Avnet, ComponentLink7Description=https://datasheet.ciiva.com/17339/taj-17339677.pdf?src-supplier=Avnet+Europe, ComponentLink7URL=https://datasheet.ciiva.com/17339/taj-17339677.pdf?src-supplier=Avnet+Europe, ComponentLink8Description=https://datasheet.ciiva.com/22667/1719052-22667581.pdf?src-supplier=Element14, ComponentLink8URL=https://datasheet.ciiva.com/22667/1719052-22667581.pdf?src-supplier=Element14, Construction=Flat, Depth=4.3mm, Dissipation Factor=10%, Features="General Purpose", Height=4.3mm, Height - Seated (Max)=0.169inch, Lead Free="Lead Free", Length=7.3mm, Manufacturer Part Number=TAJE107M025RNJ, Mount="Surface Mount", Number of Pins=2, Packaging="Tape and Reel", Polarity=Polar, Pricing 1="1=2.81000, 10=2.81000, 50=2.81000, 100=2.19000, 1000=1.76000, 10000=1.76000 (USD)", Radiation Hardening=No, REACH SVHC="No SVHC", RoHS=Yes, RoHS Compliant=Yes, Series=TAJ, Stock 1=109, Supplier 1=Mouser, Termination=SMD/SMT, Voltage Rating (DC)=25V, Width=4.3mm
C15 C16: library part 885012205080, "CAP CER 1000PF 100V X7R 0402", LCSC Part Number=C2176546, Manufacturer="Wurth Electronics", Supplier Part Number 1=732-12243-1-ND, ComponentLink1Description=https://katalog.we-online.de/pbs/datasheet/885012205080.pdf?src-supplier=Digi-Key, ComponentLink1URL=https://katalog.we-online.de/pbs/datasheet/885012205080.pdf?src-supplier=Digi-Key, Manufacturer Part Number=885012205080, Pricing 1="1=0.10000, 10=0.01900, 100=0.01730, 500=0.01532 (USD)", RoHS=Yes, Stock 1=13604, Supplier 1=Digi-Key
D1: "Diode Switching 50V 1A 2-Pin SMA T/R", Average Rectified Current=1A, Capacitance=10pF, Case/Package=SMA, Forward Voltage=1.1V, LCSC Part Number=C150735, Manufacturer=Diodes, Max Forward Surge Current (Ifsm)=30A, Max Operating Temperature=150°C, Max Repetitive Reverse Voltage (Vrrm)=50V, Max Reverse Current=5uA, Min Operating Temperature=-65°C, Package Quantity=5000, Supplier Part Number 1=S1A-FDICT-ND, Category="Rectifier Diodes", ComponentLink1Description=http://www.mouser.com/ds/2/115/ds16008-60440.pdf?src-supplier=Mouser, ComponentLink1URL=http://www.mouser.com/ds/2/115/ds16008-60440.pdf?src-supplier=Mouser, ComponentLink2Description=http://www.diodes.com///datasheets/ds16008.pdf?src-supplier=Avnet, ComponentLink2URL=http://www.diodes.com///datasheets/ds16008.pdf?src-supplier=Avnet, ComponentLink3Description=http://www.te.com/commerce/DocumentDelivery/DDEController?Action=showdoc&DocId=Data+Sheet%7FRPII%2F2%7F0415%7Fpdf%7FEnglish%7FENG_DS_RPIIX2_0415.pdf&src-supplier=Digi-Key, ComponentLink3URL=http://www.te.com/commerce/DocumentDelivery/DDEController?Action=showdoc&DocId=Data+Sheet%7FRPII%2F2%7F0415%7Fpdf%7FEnglish%7FENG_DS_RPIIX2_0415.pdf&src-supplier=Digi-Key, ComponentLink4Description=https://www.diodes.com/assets/Datasheets/ds16008.pdf?src-supplier=Digi-Key, ComponentLink4URL=https://www.diodes.com/assets/Datasheets/ds16008.pdf?src-supplier=Digi-Key, ComponentLink5Description=https://datasheet.ciiva.com/911/ds16003-911872.pdf?src-supplier=Digi-Key, ComponentLink5URL=https://datasheet.ciiva.com/911/ds16003-911872.pdf?src-supplier=Digi-Key, ComponentLink6Description=https://datasheet.ciiva.com/27052/1541520-27052419.pdf?src-supplier=Jameco, ComponentLink6URL=https://datasheet.ciiva.com/27052/1541520-27052419.pdf?src-supplier=Jameco, ComponentLink7Description=https://datasheet.ciiva.com/22695/1911706-22695830.pdf?src-supplier=Element14, ComponentLink7URL=https://datasheet.ciiva.com/22695/1911706-22695830.pdf?src-supplier=Element14, ComponentLink8Description=https://datasheet.ciiva.com/16199/ds16003-16199336.pdf?src-supplier=Future+Electronics, ComponentLink8URL=https://datasheet.ciiva.com/16199/ds16003-16199336.pdf?src-supplier=Future+Electronics, ComponentLink9Description=https://datasheet.ciiva.com/4453/ds16003-83672-4453580.pdf?src-supplier=Mouser, ComponentLink9URL=https://datasheet.ciiva.com/4453/ds16003-83672-4453580.pdf?src-supplier=Mouser, ComponentLink10Description=https://datasheet.ciiva.com/25953/ds16003-25953033.pdf?src-supplier=Avnet+Europe, ComponentLink10URL=https://datasheet.ciiva.com/25953/ds16003-25953033.pdf?src-supplier=Avnet+Europe, ComponentLink11Description=https://datasheet.ciiva.com/8301/ds16003-8301429.pdf?src-supplier=Avnet, ComponentLink11URL=https://datasheet.ciiva.com/8301/ds16003-8301429.pdf?src-supplier=Avnet, Current Rating=1A, Element Configuration=Single, Forward Current=1A, Height=2.1mm, Lead Free="Lead Free", Length=4.6mm, Manufacturer Part Number=S1A-13-F, Max Reverse Voltage (DC)=50V, Max Surge Current=30A, Mount="Surface Mount", Number of Pins=2, Output Current=1A, Packaging="Tape and Reel", Peak Non-Repetitive Surge Current=30A, Polarity=Standard, Pricing 1="1=0.26000, 10=0.21300, 100=0.11290, 500=0.07424, 1000=0.05049, 2000=0.04554 (USD)", Radiation Hardening=No, REACH SVHC="No SVHC", Recovery Time=1.8us, Reverse Recovery Time=3us, Reverse Voltage (DC)=50V, RoHS=Yes, RoHS Compliant=Yes, Series=-, Stock 1=647079, Supplier 1=Digi-Key, Termination=SMD/SMT, Voltage Rating (DC)=50V, Weight=0.002258oz, Width=2.92mm
L1: library part GLFR1608T470M-LR, "47uH ±20% 0603 Inductors (SMD) ROHS"
L2: library part CMI160808J220KT, "22uH ±10% 0603 Inductors (SMD) ROHS"
L3: library part WPN4020H1R0MT, "FIXED IND 1UH 5.8A 26 MOHM SMD", LCSC Part Number=C98359, Manufacturer=Sunlord, Supplier Part Number 1=3442-WPN4020H1R0MTTR-ND, Category="Fixed Inductors", Manufacturer Part Number=WPN4020H1R0MT, RoHS=Yes, Supplier 1=Digi-Key
LED1: library part LTST-C281KRKT, "Standard LEDs - SMD SMD LED Red 631nm 54mcd 130VA", Case Code (Imperial)=0402, Case Code (Metric)=1005, Forward Current=20mA, Forward Voltage=2V, Lens Color=Colorless, Manufacturer="Vishay Lite-On", Max Operating Temperature=85°C, Min Operating Temperature=-30°C, Package Quantity=3000, Power Dissipation=62.5mW, Reverse Voltage=5V, Supplier Part Number 1=859-LTST-C281KRKT, Case/Package=0402, Color=Red, ComponentLink1Description=http://optoelectronics.liteon.com/ja-jp/api/DwonloadFileHandler.ashx?txtSpecNo=DS22-2008-0117&txtPartNo=LTST-C281KRKT&src-supplier=Avnet, ComponentLink1URL=http://optoelectronics.liteon.com/ja-jp/api/DwonloadFileHandler.ashx?txtSpecNo=DS22-2008-0117&txtPartNo=LTST-C281KRKT&src-supplier=Avnet, ComponentLink2Description=http://components.arrow.com/part/dataview/52218614S9812790N1331?src-supplier=Arrow, ComponentLink2URL=http://components.arrow.com/part/dataview/52218614S9812790N1331?src-supplier=Arrow, ComponentLink3Description=http://www.mouser.com/ds/2/239/LTST-C281KRKT-1141717.pdf?src-supplier=Mouser, ComponentLink3URL=http://www.mouser.com/ds/2/239/LTST-C281KRKT-1141717.pdf?src-supplier=Mouser, ComponentLink4Description=http://optoelectronics.liteon.com/upload/download/DS22-2008-0117/P_100_LTST-C281KRKT.pdf?src-supplier=Future+Electronics, ComponentLink4URL=http://optoelectronics.liteon.com/upload/download/DS22-2008-0117/P_100_LTST-C281KRKT.pdf?src-supplier=Future+Electronics, ComponentLink5Description=http://optoelectronics.liteon.com/upload/download/DS22-2008-0117/LTST-C281KRKT.pdf?src-supplier=Digi-Key, ComponentLink5URL=http://optoelectronics.liteon.com/upload/download/DS22-2008-0117/LTST-C281KRKT.pdf?src-supplier=Digi-Key, Depth=0.5mm, Dominant Wavelength=631nm, Height=0.35mm, Illumination Color=Red, Lead Free="Lead Free", Length=1mm, Lens Style=Diffused,Colorless,Rectangular,Clear, Lens Transparency=Clear, Luminous Intensity=54mcd, Manufacturer Part Number=LTST-C281KRKT, Mount="Surface Mount", Number of Elements=1, Number of LEDs=1, Number of Pins=2, Packaging="Tape and Reel", Pricing 1="1=0.45, 10=0.25, 100=0.114, 1000=0.082, 3000=0.064, 9000=0.057 (USD)", Stock 1=2790, Supplier 1=Mouser, Test Current=20mA, Viewing Angle=130°, Width=0.5mm
LED2: library part 16-213/GHC-YR1S1/3T, "Green 520~535nm 0402 Light Emitting Diodes (LED) RoHS", LCSC Part Number=C74338, Manufacturer="Everlight Elec", Package=0402, ComponentLink1Description=LCSC, ComponentLink1URL=https://www.lcsc.com/product-detail/Light-Emitting-Diodes-LED_Everlight-Elec-16-213-GHC-YR1S1-3T_C74338.html, Dominant Wavelength / Coordinate rank=520~535nm, Illumination Color=Green, Luminous Intensity (IF=20mA)=112~285mcd, Manufacturer Part Number=16-213/GHC-YR1S1/3T, Mounting Type="Surface Mount"
P1: "P=5.0mm Screw terminal RoHS", Manufacturer="Ningbo Kangnex Elec", Package=Custom, Manufacturer Part No=WJ301V-5.0-3P
P2 P3: "CONN HEADER 6 POS 2.54", Color=Black, Current Rating=3A, Manufacturer="Wurth Electronics", Max Operating Temperature=125°C, Min Operating Temperature=-40°C, Supplier Part Number 1=20X0957, Voltage Rating=250V, Category="Headers and Wire Housings", ComponentLink1Description=http://www.mouser.com/ds/2/445/6130xx11121-538006.pdf?src-supplier=Mouser, ComponentLink1URL=http://www.mouser.com/ds/2/445/6130xx11121-538006.pdf?src-supplier=Mouser, ComponentLink2Description=http://www.farnell.com/cad/1737268.pdf?src-supplier=Element14, ComponentLink2URL=http://www.farnell.com/cad/1737268.pdf?src-supplier=Element14, ComponentLink3Description=https://katalog.we-online.de/em/datasheet/6130xx11121.pdf?src-supplier=Digi-Key, ComponentLink3URL=https://katalog.we-online.de/em/datasheet/6130xx11121.pdf?src-supplier=Digi-Key, Connector Type="Male Pin", Contact Gender=Male, Contact Material="Copper Alloy,Copper", Contact Mating Length=0.236inch, Contact Plating=Gold, Contact Type="Male Pin", Gender=Male, Housing Material=PBT, Lead Free="Lead Free", Manufacturer Part Number=61300611121, Mount="Through Hole", Number of Contacts=6, Number of Positions=6, Number of Rows=1, Packaging=Bulk, Pitch=0.1inch, Pricing 1="1=0.34000, 10=0.28900, 25=0.24000, 50=0.20100, 100=0.18200 (USD)", REACH SVHC=Unknown, RoHS=Yes, RoHS Compliant=Yes, Series=WR-PHD, Stock 1=4996, Supplier 1=Newark, Termination="Through Hole"
P4: "P=5.0mm Screw terminal RoHS", LCSC Part Number=C8483, Manufacturer="Ningbo Kangnex Elec", Package=Custom, ComponentLink1Description=LCSC, ComponentLink1URL=https://www.lcsc.com/product-detail/Screw-terminal_Ningbo-Kangnex-Elec-WJ301V-5-0-3P_C8483.html, Manufacturer Part Number=WJ301V-5.0-3P
Q1: "100nA 50V 225mW 1.5A 500mV@800mA,80mA NPN -55℃~+150℃@(Tj) SOT-23(SOT-23-3) Bipolar Transistors - BJT ROHS"
Q2: "60V 8A 2.1W 20mΩ@10V,8A 2.2V@250uA N Channel SOP-8 MOSFETs ROHS"
R1: library part CRCW060322R0JNEAHP, "RES SMD 22 OHM 5% 1/3W 0603", Case Code (Imperial)=0603, Case Code (Metric)=1608, Manufacturer="Vishay Dale", Max Operating Temperature=155°C, Min Operating Temperature=-55°C, Package Quantity=5000, Power Rating=250mW, Supplier Part Number 1=541-22SACT-ND, Temperature Coefficient=200ppm/°C, Tolerance=5%, Voltage Rating=75V, Case/Package=0603, ComponentLink1Description=http://www.vishay.com/docs/20043/crcwhpe3.pdf?src-supplier=Avnet+Europe, ComponentLink1URL=http://www.vishay.com/docs/20043/crcwhpe3.pdf?src-supplier=Avnet+Europe, ComponentLink2Description=http://www.mouser.com/ds/2/427/dcrcwe3-109170.pdf?src-supplier=Mouser, ComponentLink2URL=http://www.mouser.com/ds/2/427/dcrcwe3-109170.pdf?src-supplier=Mouser, Composition="Thick Film", Contact Plating=Tin, Depth=0.85mm, Height=0.45mm, Lead Free="Lead Free", Length=1.6mm, Manufacturer Part Number=CRCW060322R0JNEAHP, Military Standard=Not, Mount="Surface Mount", Packaging="Tape and Reel", Pricing 1="1=0.15, 10=0.129, 100=0.0506, 1000=0.02119, 2500=0.01942 (USD)", Radiation Hardening=No, Resistance=22R, Stock 1=245392, Supplier 1=Digi-Key, Weight=7.1E-05oz, Width=0.8mm
R2 R3 R4 R5 R8 R9 R10 R11: library part AC0603JR-0710KL, "RES SMD 10K OHM 5% 1/10W 0603", Case Code (Imperial)=0603, Case Code (Metric)=1608, LCSC Part Number=C140867, Manufacturer=Yageo, Max Operating Temperature=155°C, Max Power Dissipation=100mW, Min Operating Temperature=-55°C, Package Quantity=1, Resistance=10kR, Resistor Type="Thick Film", Supplier Part Number 1=1029044, Temperature Coefficient=100ppm/°C, Tolerance=5%, Voltage Rating=50V, Case/Package=0603, Category="Chip SMD Resistors", ComponentLink1Description=https://datasheet.ciiva.com/5562/pyu-ac-51-rohs-l-2-5562553.pdf?src-supplier=Mouser, ComponentLink1URL=https://datasheet.ciiva.com/5562/pyu-ac-51-rohs-l-2-5562553.pdf?src-supplier=Mouser, Construction=Rectangular, Depth=0.8mm, Features="Moisture Resistant,Automotive AEC-Q200,Anti-Sulfur", Height=0.022inch, Lead Free="Lead Free", Length=0.063inch, Manufacturer Part Number=AC0603JR-0710KL, Military Standard=Not, Number of Terminations=2, Packaging="Tape and Reel", Power Rating=100mW, Pricing 1="5000=0.00540 (USD)", RoHS=Yes, RoHS Compliant=Yes, Series=AC, Size Code=0603, Stock 1=1533000, Supplier 1="Future Electronics", Termination=SMD/SMT, Width=0.031inch
R6: library part ERJ-2GEJ102X, "RES SMD 1K OHM 5% 1/10W 0402", Case Code (Imperial)=0402, Case Code (Metric)=1005, Manufacturer=Panasonic, Max Operating Temperature=155°C, Max Power Dissipation=100mW, Min Operating Temperature=-55°C, Package Quantity=1, Resistance=1kR, Supplier Part Number 1=P1.0KJCT-ND, Temperature Coefficient=200ppm/°C, Tolerance=5%, Voltage Rating=50V, Case/Package=0402, ComponentLink1Description=https://industrial.panasonic.com/cdbs/www-data/pdf/RDA0000/AOA0000C301.pdf?src-supplier=Future+Electronics, ComponentLink1URL=https://industrial.panasonic.com/cdbs/www-data/pdf/RDA0000/AOA0000C301.pdf?src-supplier=Future+Electronics, ComponentLink2Description=http://www.jameco.com/Jameco/Products/ProdDS/1986781.pdf?src-supplier=Jameco, ComponentLink2URL=http://www.jameco.com/Jameco/Products/ProdDS/1986781.pdf?src-supplier=Jameco, ComponentLink3Description=http://www.farnell.com/datasheets/2059623.pdf?src-supplier=Farnell, ComponentLink3URL=http://www.farnell.com/datasheets/2059623.pdf?src-supplier=Farnell, ComponentLink4Description=http://industrial.panasonic.com/www-data/pdf/AOA0000/AOA0000CE1.pdf?src-supplier=Avnet, ComponentLink4URL=http://industrial.panasonic.com/www-data/pdf/AOA0000/AOA0000CE1.pdf?src-supplier=Avnet, ComponentLink5Description=http://www.alliedelec.com/m/d/51cd0790071e1666bdb9d00c57fcf960.pdf?src-supplier=Allied+Electronics, ComponentLink5URL=http://www.alliedelec.com/m/d/51cd0790071e1666bdb9d00c57fcf960.pdf?src-supplier=Allied+Electronics, ComponentLink6Description=http://industrial.panasonic.com/www-data/pdf/AOA0000/AOA0000CE1.pdf?src-supplier=Avnet+Europe, ComponentLink6URL=http://industrial.panasonic.com/www-data/pdf/AOA0000/AOA0000CE1.pdf?src-supplier=Avnet+Europe, ComponentLink7Description=http://www.farnell.com/datasheets/2059623.pdf?src-supplier=Element14, ComponentLink7URL=http://www.farnell.com/datasheets/2059623.pdf?src-supplier=Element14, ComponentLink8Description=http://industrial.panasonic.com/cdbs/www-data/pdf/RDA0000/AOA0000C301.pdf?src-supplier=Farnell, ComponentLink8URL=http://industrial.panasonic.com/cdbs/www-data/pdf/RDA0000/AOA0000C301.pdf?src-supplier=Farnell, ComponentLink9Description=http://industrial.panasonic.com/www-data/pdf/AOA0000/AOA0000CE1.pdf?src-supplier=Avnet+Asia, ComponentLink9URL=http://industrial.panasonic.com/www-data/pdf/AOA0000/AOA0000CE1.pdf?src-supplier=Avnet+Asia, Composition="Thick Film", Contact Plating=Tin, Depth=0.5mm, Features="Automotive AEC-Q200", Height=0.35mm, Lead Free="Lead Free", Length=1mm, Manufacturer Part Number=ERJ-2GEJ102X, Military Standard=Not, Mount="Surface Mount", Number of Terminations=2, Packaging="Tape and Reel", Power Rating=100mW, Pricing 1="1=0.1, 10=0.032, 100=0.0129, 1000=0.00578, 2500=0.00502, 5000=0.00414 (USD)", Radiation Hardening=No, REACH SVHC="No SVHC", Stock 1=3855795, Supplier 1=Digi-Key, Termination=SMD/SMT, Voltage Rating (DC)=50V, Width=0.02inch, Working Voltage=50V
R7 R12 R13 R14 R15 R18 R19: library part RC0603JR-075K1L, "RES SMD 5.1K OHM 5% 1/10W 0603", Case Code (Imperial)=0603, Case Code (Metric)=1608, LCSC Part Number=C14677, Manufacturer=Yageo, Max Operating Temperature=155°C, Max Power Dissipation=100mW, Min Operating Temperature=-55°C, Resistance=5.1kR, Resistance Tolerance=5%, Resistor Type="Thick Film", Supplier Part Number 1=311-5.1KGRCT-ND, Temperature Coefficient=100ppm/°C, Voltage Rating=50V, Case/Package=0603, Category="Chip SMD Resistors", ComponentLink1Description=http://www.mouser.com/ds/2/447/RC0603-272842.pdf?src-supplier=Mouser, ComponentLink1URL=http://www.mouser.com/ds/2/447/RC0603-272842.pdf?src-supplier=Mouser, ComponentLink2Description=http://components.arrow.com/part/dataview/0323_00047491?src-supplier=Arrow+Europe, ComponentLink2URL=http://components.arrow.com/part/dataview/0323_00047491?src-supplier=Arrow+Europe, ComponentLink3Description=http://www.farnell.com/datasheets/2167052.pdf?src-supplier=Farnell, ComponentLink3URL=http://www.farnell.com/datasheets/2167052.pdf?src-supplier=Farnell, ComponentLink4Description=http://www.farnell.com/datasheets/2167052.pdf?src-supplier=Element14, ComponentLink4URL=http://www.farnell.com/datasheets/2167052.pdf?src-supplier=Element14, ComponentLink5Description=http://www.farnell.com/datasheets/2167052.pdf?src-supplier=Newark, ComponentLink5URL=http://www.farnell.com/datasheets/2167052.pdf?src-supplier=Newark, ComponentLink6Description=http://www.farnell.com/datasheets/1868787.pdf?src-supplier=Newark, ComponentLink6URL=http://www.farnell.com/datasheets/1868787.pdf?src-supplier=Newark, ComponentLink7Description=http://www.yageo.com/documents/recent/PYu-RC_Group_51_RoHS_L_10.pdf?src-supplier=Digi-Key, ComponentLink7URL=http://www.yageo.com/documents/recent/PYu-RC_Group_51_RoHS_L_10.pdf?src-supplier=Digi-Key, ComponentLink8Description=http://www.yageo.com/documents/recent/PYu-RC0603_51_RoHS_L_7.pdf?src-supplier=Future+Electronics, ComponentLink8URL=http://www.yageo.com/documents/recent/PYu-RC0603_51_RoHS_L_7.pdf?src-supplier=Future+Electronics, Construction=Rectangular, Depth=0.8mm, Features="Moisture Resistant", Lead Free="Lead Free", Length=1.6mm, Manufacturer Part Number=RC0603JR-075K1L, Military Standard=Not, Number of Pins=2, Number of Terminations=2, Packaging="Tape and Reel", Power Rating=100mW, Pricing 1="1=0.10000, 10=0.02000, 100=0.00800, 1000=0.00360, 2500=0.00312 (USD)", REACH SVHC="No SVHC", RoHS=Yes, RoHS Compliant=Yes, Series=RC, Size Code=0603, Stock 1=245818, Supplier 1=Digi-Key, Termination=SMD/SMT, Tolerance=5%, Voltage Rating (DC)=50V
R16: library part CRCW08054K70FKEAHP, "Res Thick Film 0805 4.7K Ohm 1% 0.5W ±100ppm/°C Molded SMD SMD Paper T/R", Case Code (Imperial)=0805, Case Code (Metric)=2012, LCSC Part Number=C313926, Manufacturer=Vishay, Max Operating Temperature=155°C, Max Power Dissipation=500mW, Min Operating Temperature=-55°C, Package Quantity=5000, Power Rating=330mW, Ratings=AEC-Q200, Resistance=4.7kR, Resistance Tolerance=1%, Resistor Type="Thick Film", Supplier Part Number 1=8123574P, Temperature Coefficient=100ppm/°C, Voltage Rating=150V, Case/Package=0805, Category="Chip SMD Resistors", ComponentLink1Description=https://datasheet.ciiva.com/8079/424479-8079653.pdf?src-supplier=Element14, ComponentLink1URL=https://datasheet.ciiva.com/8079/424479-8079653.pdf?src-supplier=Element14, ComponentLink2Description=https://datasheet.ciiva.com/9072/crcwhpe3-9072073.pdf?src-supplier=Avnet, ComponentLink2URL=https://datasheet.ciiva.com/9072/crcwhpe3-9072073.pdf?src-supplier=Avnet, Construction=Rectangular, Contact Plating=Tin, Depth=1.25mm, Features="Automotive AEC-Q200", Height=0.5mm, Item Type=Resistor, Lead Free="Lead Free", Length=2mm, Manufacturer Part Number=CRCW08054K70FKEAHP, Military Standard=Not, Mount="Surface Mount", Number of Terminations=2, Packaging="Tape and Reel", Pricing 1="100=0.15700, 250=0.14600, 500=0.13600, 1000=0.12500 (GBP)", Radiation Hardening=No, RoHS=Yes, RoHS Compliant=Yes, Series=CRCW-HP, Stock 1=8150, Supplier 1=RSComponents, Technology="THICK FILM", Termination=SMD/SMT, Tolerance=1%, Voltage Rating (DC)=150V, Weight=0.000194oz, Width=1.2mm
SB1 SB2 SB3 SB4 SB5: "Solder Bridge ON"
SW1 SW2 SW3: "Shrouded 5A SPDT 125V 6.3mm 13.5mm 125V 6.6mm 5A PCPin 10000 Rectangular columnar -40℃~+85℃ Black Plugin Slide Switches ROHS", LCSC Part Number=C388633, Manufacturer="XKB Connectivity", Package=Custom, ComponentLink1Description=LCSC, ComponentLink1URL=https://www.lcsc.com/product-detail/Slide-Switches_XKB-Connectivity-SS-12D11G5R_C388633.html, Manufacturer Part Number=SS-12D11G5R
U1: "SOP-8 Position Sensor ROHS", Manufacturer="Magn Tek", Package=SOP-8, ComponentLink1Description=LCSC, ComponentLink1URL=https://www.lcsc.com/product-detail/Position-Sensor_Magn-Tek-MT6701CT-STD-R_C3003196.html, Manufacturer Part Number=MT6701CT-STD-R
U4: "40-V max, 8-A peak, sensorless FOC control 3-phase BLDC motor driver 40-VQFN -40 to 125", Manufacturer="Texas Instruments", Supplier Part Number 1=595-MCF8316A1VRGFR, Manufacturer Part Number=MCF8316A1VRGFR, Pricing 1="1=5.48000, 10=4.92000, 25=4.65000, 50=4.65000, 100=4.04000, 250=3.83000, 500=3.44000, 1000=3.00000, 10000=3.00000 (USD)", RoHS=No, Stock 1=889, Supplier 1=Mouser

## Free pads (board coordinates)
  round 98.43 hole 78.74: MH1(58,58) MH2(57,1399) MH3(2046,1399) MH4(2045,59)

## Via types
v1: diameter 23.62, hole 11.81, Top Layer to Bottom Layer, 52 vias
v2: diameter 19.68, hole 11.81, Top Layer to Bottom Layer, 16 vias
v3: diameter 23.62, hole 11.81, Top Layer to Bottom Layer, tented both sides, 3 vias

## Nets (pads, with @x,y where several pads share a name; then routed paths per layer and width w, separated by ;. In a path a pad name is that pad's centre, name@x,y a point inside that pad or via, vN(x,y) a via of type N, cw(c..) or ccw(c..) an arc to the next point about the centre after c; other vN are vias at no path point)
3V3_ENC: C17.1 P3.6 SB4.2 U1.1 U1.2 | length 1348.5
  Top Layer w25: C17.1 v1(1088.75,674) SB4.2
  Bottom Layer w25: U1.2@1078.28,620.01 U1.2 1172.27,618.73 1252,539 1787.98,539 1888,438.98 1888,239 1955,172 P3.6@2047,172
AGND: C1.1 C9.1 C10.1 R8.2 R9.2 R10.2 SB5.1 U4.2 U4.4 U4.26 U4.41 | length 3769.8
  Top Layer w8: U4.4 1697.07,1223.21 v2(1701.01,1227.15) ; U4.2 1695.17,1262.58 1764,1193.75 U4.41 ; v2(1826.99,1174.05) 1826.99,1170 1832.83,1164.16 U4.26
  Top Layer w10: C9.1 1622.42,1262.58 U4.2
  Top Layer w25: v1(667,267) v1(936,267) ; v1(936,674) SB5.1 ; v1(1255,267) v1(1463,267) ; v1(1463,119) 1868,119 1987,238 1987,1061 1929,1119 v1(1890,1119)
  Bottom Layer w25: R8.2 v1(667,267) ; v1(936,674) v1(936,267) R9.2 v1(1255,267) ; v1(1463,119) v1(1463,267) R10.2 ; v1(1568,1345) 1622.32,1345 1701.01,1266.31 v2(1701.01,1227.15)
  other v2: 1739.39,1071.69 1788.61,1071.69 1701.01,1120.85 1739.39,1120.85 1788.61,1120.9 1826.99,1120.9 1701.01,1174 1739.39,1174 1788.61,1174.05 1739.39,1227.15 1788.61,1227.2 1826.99,1227.2 1739.39,1276.36 1788.61,1276.41
AVDD: C10.2 R3.1 R4.1 R5.1 R7.2 R12.2 R13.2 R14.2 R15.2 R18.2 R19.2 SB4.1 U4.27 | length 3808
  Top Layer w8: U4.27 1913.17,1183.84 1918.83,1178.19 1918.83,1166.17 v1(1932,1153)
  Top Layer w22: v1(1756,1347) R14.2
  Top Layer w25: v1(895,674) 895,793 939,837 998,837 R12.2@1049.5,837 ; R12.2 R7.2 1167,838 1199.5,805.5 1199.5,772.5 1236,736 ; SB4.1 1306,734 v1(1452,880)
  Bottom Layer w22: v1(1756,1347) 1875,1347 R18.2
  Bottom Layer w25: R3.1 281,267 345,203 803,203 ; v1(895,674) 895,561 858,524 792,524 728,460 728,316 777,267 829,267 829,229 803,203 ; 1392,203 803,203 ; 1398,203 1423,228 R5.1@1423,267 ; v1(1452,880) 1903,880 1931,908 R13.2
BRAKE: SW1.2 U4.35 | length 2931.5
  Top Layer w8: U4.35 1793.53,1372.53 v1(1822,1401)
  Bottom Layer w25: SW1.2 319.5,519.5 248.5,519.5 108,660 108,1305.75 203.25,1401 v1(1822,1401)
CP: C12.2 R2.1 U4.8 | length 904.1
  Top Layer w8: C12.2 1613,1093 1624,1104 1624,1123 v1(1634.74,1133.74) 1645.47,1144.47 U4.8
  Top Layer w22: v1(1069,1025) 1144,1100 v1(1361,1100)
  Bottom Layer w22: R2.1 1032,988 v1(1069,1025) ; v1(1361,1100) 1601,1100 v1(1634.74,1133.74)
CPH: C11.2 U4.7 | length 92
  Top Layer w8: C11.2 1614,1151 1627.16,1164.16 U4.7
CPL: C11.1 U4.6 | length 176.6
  Top Layer w8: C11.1 1523,1179.16 1527.69,1183.84 U4.6
CSN_ENC: P3.4 R7.1 U1.8 | length 1208.6
  Top Layer w25: R7.1 v1(1130,778)
  Bottom Layer w25: v1@1127,781 U1.8 ; v1(1130,778) 1305,603 1814.49,603 1952,465.49 1952,397 1977,372 P3.4@2047,372
DIR: SW3.2 U4.34 | length 4351.3
  Top Layer w8: U4.34 1813.21,1347.21 1846,1380 v1(1846,1435)
  Top Layer w25: v1(73,512) 1510.19,512 SW3.2
  Bottom Layer w25: v1(73,512) 73,1316 191,1434 1845,1434 v1(1846,1435)
DRVOFF: SW2.2 U4.21 | length 2060
  Top Layer w8: U4.21 1938.27,1065.73 1955,1049 1955,1005
  Top Layer w25: SW2.2 1022.59,245.41 1100,168 1867,168 1955,256 1955,1005
DVDD: C9.2 U4.1 | length 71.5
  Top Layer w8: 1640,1329.5 1640,1293.43 1651.16,1282.27 U4.1 U4.1@1668.59,1283.19
FG: P2.4 R13.1 U4.29 | length 385.1
  Top Layer w10: U4.29 1979.79,1223.21 1990,1213 v1(1990,1190)
  Bottom Layer w10: v1(1990,1190) 1990,1135 R13.1 1991,1039 P2.4
GND_ENC: C17.2 P3.5 SB5.2 U1.4 | length 1515.5
  Top Layer w25: SB5.2 v1(1016,734) C17.2
  Bottom Layer w25: U1.4 977,695 v1(1016,734) 1128,734 1291,571 1801.24,571 1920,452.24 1920,300 1948,272 P3.5@2047,272
NetC3_2: C3.2 C5.2 C7.1 C15.2 L3.1 Q2.5 Q2.6 Q2.7 Q2.8
  other v1: 693,689 722,689
NetD1_2: D1.2 Q1.2 | length 94
  Bottom Layer w25: D1.2 692.06,969.31 774.09,969.31 777.73,972.96 Q1.2
NetL1_2: L1.2 SB1.1 | length 110.4
  Top Layer w22: SB1.1 v3(1515,1333)
  Bottom Layer w22: v3(1515,1333) 1515,1257.93 1515.81,1257.12 L1.2
NetL2_2: L2.2 SB2.1 | length 110.4
  Top Layer w22: SB2.1 v3(1461,1333)
  Bottom Layer w22: v3(1461,1333) 1461,1257.93 1461.81,1257.12 L2.2
NetLED1_2: LED1.2 R6.1 | length 60.3
  Top Layer w12: LED1.2 R6.1
NetLED2_2: LED2.2 R16.1
NetQ1_1: Q1.1 R11.1 | length 7.8
  Bottom Layer w25: R11.1 R11.1@849.5,926.5 ; Q1.1@849.5,970.59 Q1.1
NetQ1_3: Q1.3 Q2.4 R2.2 | length 711.4
  Top Layer w12: Q2.4 579,725 648,794 648,973 723,1048 v1(864.39,1048)
  Bottom Layer w25: Q1.3 815.13,1051.64 818.78,1048 v1(864.39,1048) R2.2
NetR1_1: R1.1 SB3.1 | length 107.9
  Top Layer w22: SB3.1 v3(1406,1333)
  Bottom Layer w22: v3(1406,1333) 1406.31,1332.69 1406.31,1260.25 R1.1
NetR3_2: R3.2 SW1.3 | length 81.4
  Bottom Layer w25: SW1.3 242.51,407.51 242.51,327.49 R3.2
NetR4_2: R4.2 SW2.3 | length 81
  Bottom Layer w25: R4.2@829,327 R4.2@829.06,327.06 ; SW2.3@829.06,407.94 SW2.3@829.12,408 ; R4.2@833.06,327.06 SW2.3@833.06,407.94
NetR5_2: R5.2 SW3.3 | length 81.3
  Bottom Layer w25: SW3.3@1422.21,408 SW3.3@1422.61,407.61 ; R5.2@1422.61,327.39 R5.2@1423,327 ; R5.2@1425.61,327.39 SW3.3@1425.61,407.61
NetR8_1: R8.1 SW1.1 | length 81
  Bottom Layer w25: R8.1 SW1.1
NetR9_1: R9.1 SW2.1 | length 81.4
  Bottom Layer w25: SW2.1@1207.07,408 SW2.1@1207.54,407.54 ; R9.1@1207.54,327.46 R9.1@1208,327 ; R9.1@1211.54,327.46 SW2.1@1211.54,407.54
NetR10_1: R10.1 SW3.1 | length 81.3
  Bottom Layer w25: SW3.1@1800.17,408 SW3.1@1800.58,407.58 ; R10.1@1800.58,327.42 R10.1@1801,327 ; R10.1@1803.58,327.42 SW3.1@1803.58,407.58
nFAULT: R6.2 R14.1 U4.40 | length 1010.2
  Top Layer w8: v1(1695,1345) 1695,1379.9 R14.1@1697,1381.9 ; U4.40 v1@1695.1,1341
  Top Layer w12: R6.2 v1(1788,748) ; v1(1788,846.5) 1845,846.5 1889,890.5 v1(1889,939)
  Bottom Layer w8: v1(1695,1345) 1695.34,1344.66 1720.34,1344.66 1764,1301 1764,1059 1778.67,1044.33 1878.67,1044.33 1889,1034 v1(1889,939)
  Bottom Layer w12: v1(1788,748) v1(1788,846.5)
OUT_A: P4.1 U4.13 U4.14 | length 719.7
  Bottom Layer w20: P4.1 1241.7,1088.3 1328,1002 v1(1701,1002)
OUT_B: P4.2 U4.16 U4.17 | length 1018.4
  Top Layer w12: v1(1764,961) 1764,1039
  Bottom Layer w20: P4.2 1044.85,1184.15 1268,961 v1(1764,961)
OUT_C: P4.3 U4.19 U4.20 | length 1221.1
  Bottom Layer w20: P4.3 1029,1132 1245,916 1796,916 1830.69,950.69 1830.69,1009.31 v1(1830,1010)
PGND: C2.2 C3.1 C4.1 C5.1 C6.1 C7.2 C8.2 C13.2 C14.2 C15.1 C16.1 P1.2 R11.2 R16.2 U4.12 U4.15 U4.18 | length 2250.3
  Top Layer w8: v1@1734.47,1002.53 v1(1734.47,1004.47) U4.15 ; v1(1793.53,1004.47) U4.18
  Top Layer w25: C14.2 934,968 v1(839,873) 1240,873 v1(1314,799) ; 1727,879 1729,877 R16.2
  Bottom Layer w22: v1(1668.68,1034) 1738,1034 1767.53,1004.47 ; v1(1734.47,1004.47) 1767.53,1004.47 ; v1(1793.53,1004.47) 1767.53,1004.47
  Bottom Layer w25: R11.2@789.5,921.5 R11.2 787,921.5 793.5,915 793.5,878.5 800,872 C5.1 C5.1@802,874.5 ; v1@1322,799 1682,799 v1(1728.21,845.21)
  Bottom Layer w50: 372,865 372,1008 415,1051 P1.2 P1.2@415,1316
  other v1: 295,916.5 295,943 295,969.5
SCL: P2.2 R19.1 U4.31 | length 280.8
  Top Layer w8: U4.31 1924.74,1262.58 1938,1275.84 v1(1938,1301)
  Bottom Layer w10: R19.1 1940.14,1269.86 1960.14,1269.86 P2.2
  Bottom Layer w12: v1(1938,1301) 1938.5,1300.5 1938.5,1271.5 R19.1
SCL_ENC: P3.3 R12.1 U1.7 | length 1330